# Altium PCB CSI2-KRIA-KV260_Rev01.PcbDoc (part 1 of 3)
Units mm, origin at the board's own origin, x right, y up, seen from the top; angles counter-clockwise.
Board outline 119 x 44.5 mm, 4 copper layers (Layer1 Top, Layer2, Layer3, Layer4 Bottom), stack 1.59 mm thick; 145 components, 82 nets, 488 pads, 229 vias.
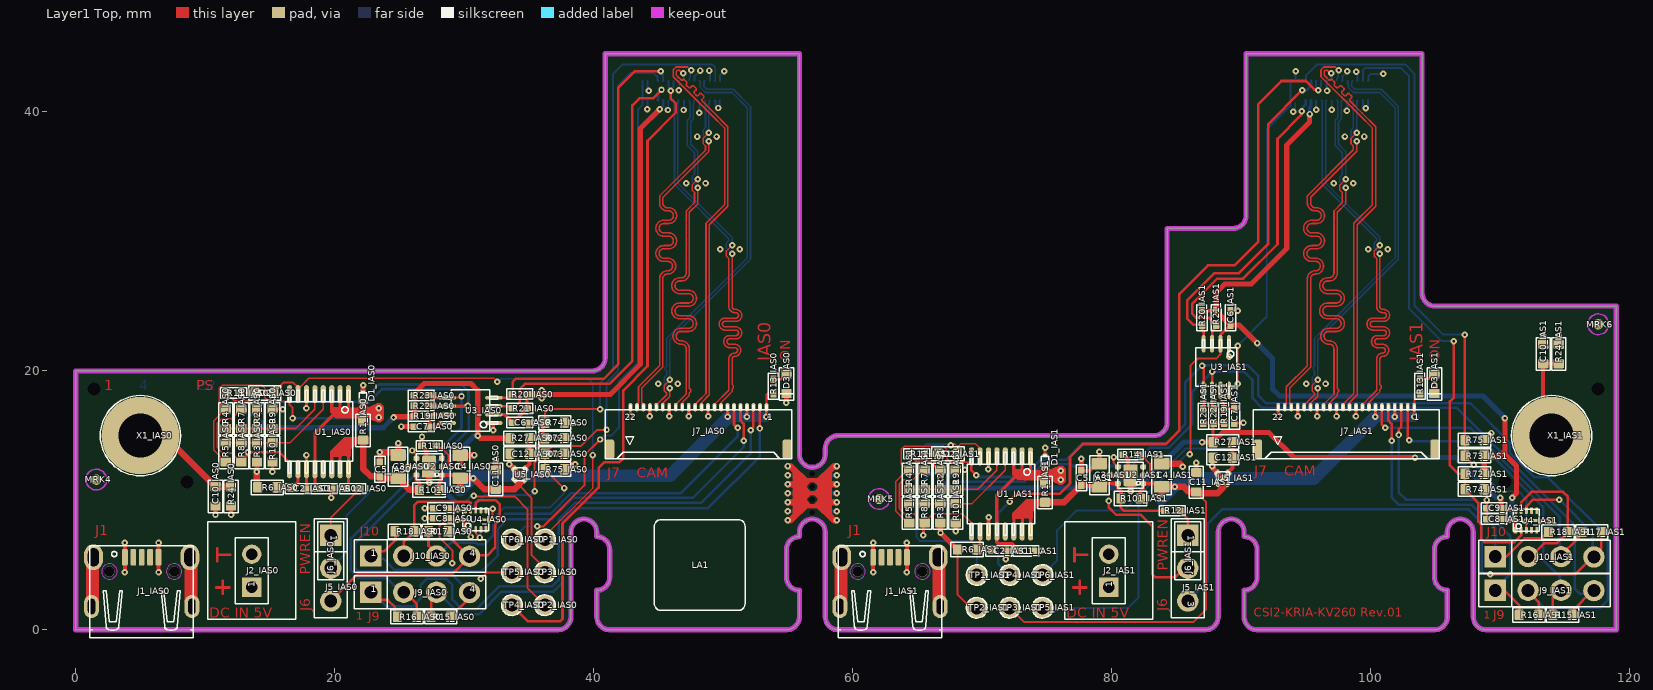
[diagram p0: Layer1 Top view]
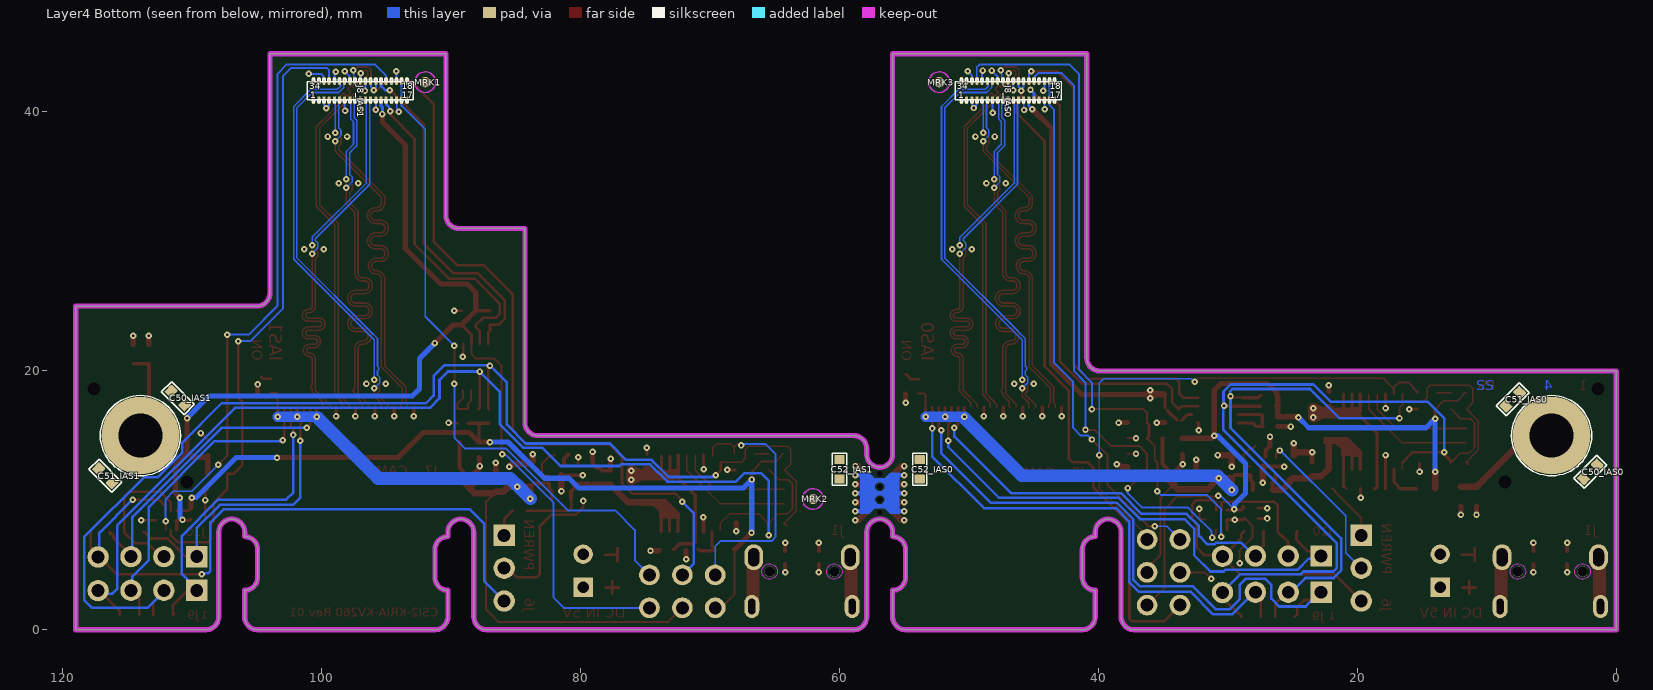
[diagram p1: Layer4 Bottom view, seen from below]
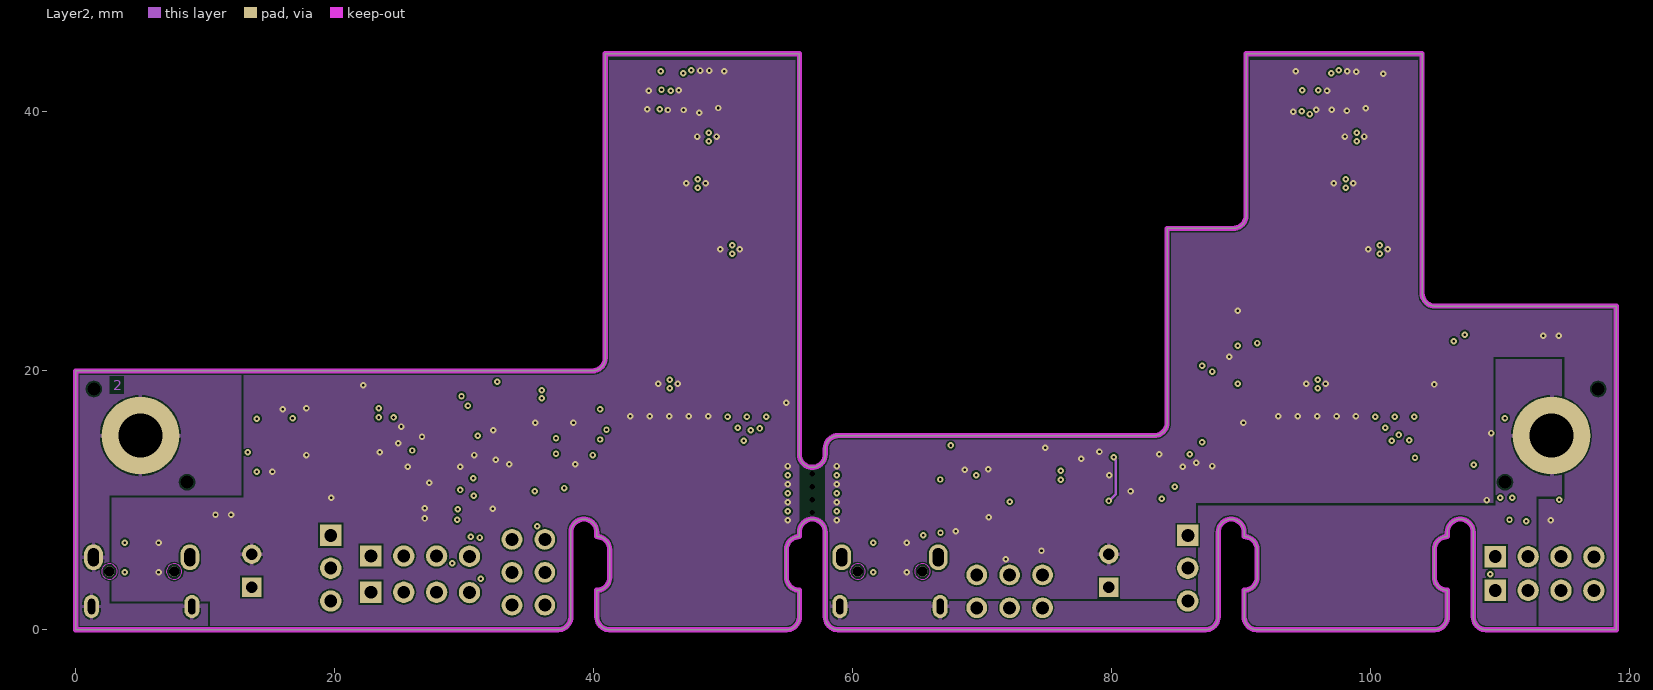
[diagram p2: Layer2]
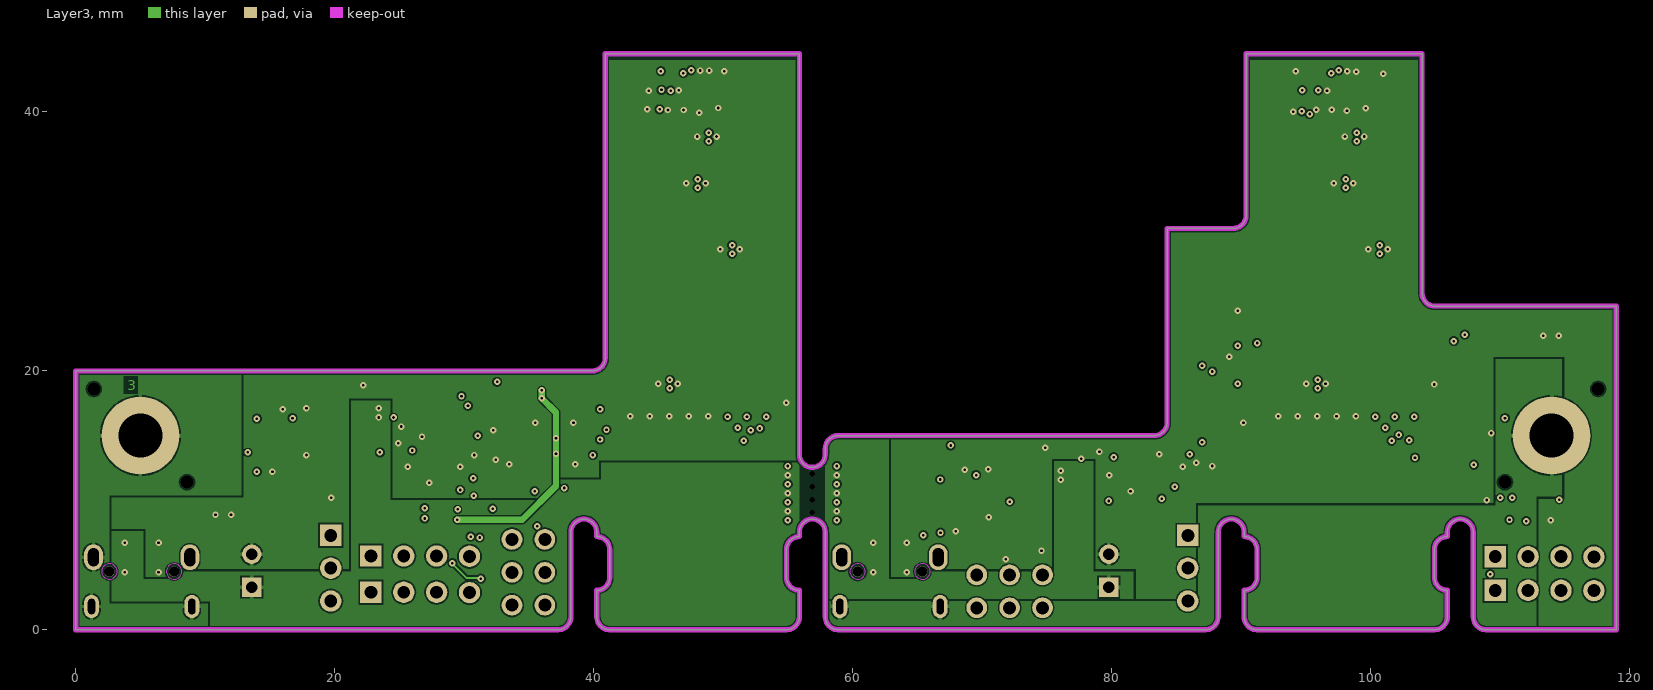
[diagram p3: Layer3]
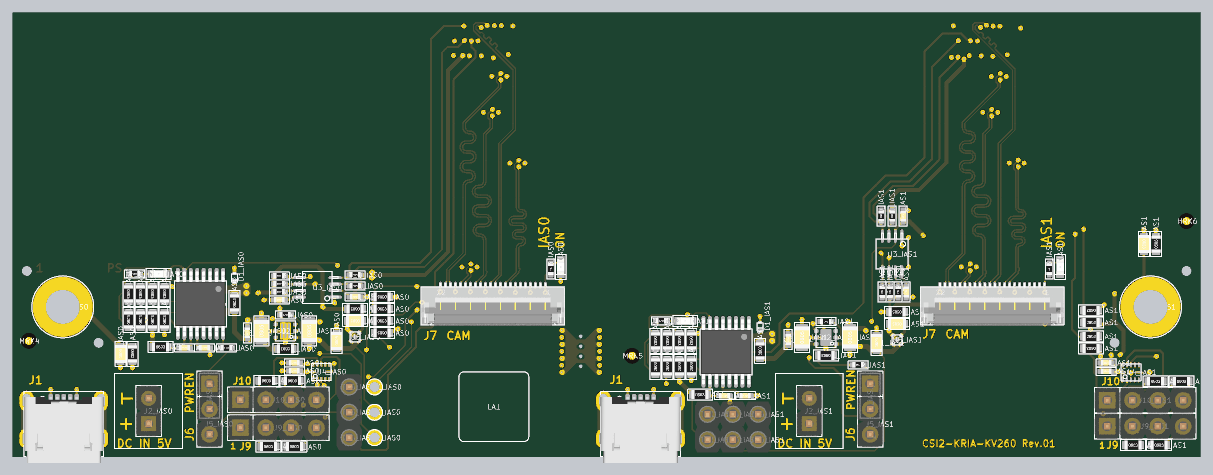
[diagram p6: 3D render of the assembled board from above, using the file's embedded part models]
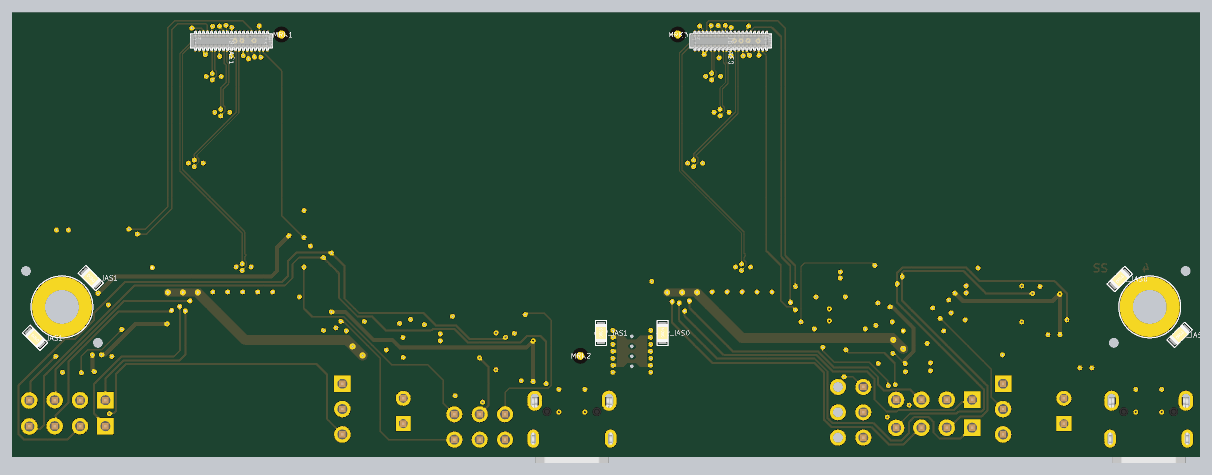
[diagram p7: 3D render of the assembled board from below, using the file's embedded part models]

## Layer stack, top to bottom
Top Solder: solder mask 0.025, Solder Resist, Dk 4
Layer1 Top: signal copper 0.035
Dielectric1: prepreg 0.16, PP-006, Dk 4.7
Layer2: signal copper 0.035
Dielectric2: core 1.13, Core-039, Dk 4.74
Layer3: signal copper 0.035
Dielectric3: prepreg 0.16, PP-006, Dk 4.7
Layer4 Bottom: signal copper 0.035
Bottom Solder: solder mask 0.025, Solder Resist, Dk 4

## Board outline
0,0 1,0 37.26,0 37.251,0 ccw(c37.251,0.999) 38.25,0.999 38.25,7.55 38.252,7.55 cw(c39.252,7.55) 40.252,7.55 40.252,7.2 40.251,7.2 cw(c40.251,6.2) 41.251,6.2 41.251,4.05 cw(c40.251,4.05) 40.251,3.05 40.25,3.05 40.25,0.99 40.251,1.001 ccw(c41.25,1) 41.249,0.001 54.9,0 54.901,0 ccw(c54.901,0.999) 55.9,1 55.899,1 55.899,3.05 55.9,3.05 cw(c55.9,4.05) 54.9,4.05 54.9,6.21 54.9,6.2 cw(c55.9,6.2) 55.9,7.2 55.899,7.2 55.899,7.55 cw(c56.899,7.55) 57.899,7.55 57.901,7.55 57.901,0.999 ccw(c58.9,0.999) 58.9,0 87.26,0 87.251,0 ccw(c87.251,0.999) 88.25,0.999 88.25,7.55 88.252,7.55 cw(c89.252,7.55) 90.252,7.55 90.252,7.2 90.251,7.2 cw(c90.251,6.2) 91.251,6.2 91.251,4.05 cw(c90.251,4.05) 90.251,3.05 90.252,3.05 90.252,1 90.251,1 ccw(c91.25,1) 91.25,0 104.95,0 ccw(c104.95,1) 105.949,1 105.948,1 105.948,3.05 105.949,3.05 cw(c105.949,4.05) 104.949,4.05 104.949,6.21 104.949,6.2 cw(c105.949,6.2) 105.949,7.2 105.948,7.2 105.948,7.55 cw(c106.948,7.55) 107.948,7.55 107.95,7.55 107.95,0.999 ccw(c108.949,0.999) 108.949,0 108.94,0 119,0 119,25 105,25 cw(c105,26) 104,26 104,44.5 90.4,44.5 90.4,32 cw(c89.401,32) 89.401,31.001 84.3,31.001 84.3,16 cw(c83.3,16) 83.3,15 83,15 58.9,15 ccw(c58.9,14) 57.9,14 57.9,13.55 cw(c56.9,13.55) 55.9,13.55 55.899,13.55 55.899,14.991 55.9,15 55.9,44.5 40.9,44.5 40.9,21 cw(c39.9,21) 39.9,20 0,20

## Design rules (kind name [scope] priority, off if disabled: settings)
BoardOutlineClearance [All] p1: gap=0.254 ignorepadtopadclearanceinfootprint=FALSE except(0: Arc-SplitContinuation Track-SplitContinuation SMDPad-SplitContinuation THPad-SplitContinuation Via-SplitContinuation Fill-SplitContinuation Poly-SplitContinuation Region-SplitContinuation Text-SplitContinuation)
Clearance [All] p1: gap=0.125 ignorepadtopadclearanceinfootprint=TRUE except(0: Arc-Hole Track-Hole SMDPad-Hole THPad-Hole Via-Hole Fill-Hole Poly-Hole Region-Hole Text-Hole; 0.3: SMDPad-SMDPad)
ComponentClearance [All] p1 off: gap=0.254 collisioncheckmode=3 verticalgap=0.254 showdistances=FALSE
DiffPairsRouting [All] p1: maxlimit=1 minlimit=0.125 mostfreqgap=0.125 toplayer_minwidth=0.125 toplayer_maxwidth=0.125 toplayer_prefwidth=0.125 midlayer1_minwidth=0.125 midlayer1_maxwidth=0.125 midlayer1_prefwidth=0.125 midlayer2_minwidth=0.125 midlayer2_maxwidth=0.125 midlayer2_prefwidth=0.125 bottomlayer_minwidth=0.125 bottomlayer_maxwidth=0.125 bottomlayer_prefwidth=0.125 maxuncoupledlength=12.7
FabricationTestPointUsage TestPointUsage [All] p1: valid=0 allowmultiple=FALSE
FabricationTestpoint Testpoint [All] p1: side=3 testpointundercomponent=TRUE minsize=1.016 maxsize=2.54 preferedsize=1.524 minholesize=0 maxholesize=1.016 preferedholesize=0.813 testpointgrid=0.025 allowsidetop=TRUE allowsidebottom=TRUE usegrid=TRUE gridtolerance=0
Height [All] p1 off: minheight=0 maxheight=25.4 prefheight=12.7
HoleSize [All] p1: absolutevalues=TRUE maxlimit=50 minlimit=0.025 maxpercent=80.000 minpercent=20.000
MatchedLengths "Schematic Matched Net Lengths" [InNetClass('100 Ohm')] p1: tolerance=0.05 checknetsindiffpair=FALSE checkdiffpairvsdiffpair=TRUE checkxsignals=TRUE checkothers=TRUE
PlaneClearance [All] p1: clearance=0.3
PlaneConnect FreePads [(InPadClass('Free-Pads'))   or (isvia)] p1: planeconnectstyle=Direct reliefexpansion=0.508 reliefentries=4 reliefconductorwidth=0.254 reliefairgap=0.254
PlaneConnect [All] p2: planeconnectstyle=Relief reliefexpansion=0.2 reliefentries=4 reliefconductorwidth=0.2 reliefairgap=0.2
PolygonConnect VIA [isvia or InComponent('X2')] p1: connectstyle=Direct reliefconductorwidth=0.2 reliefentries=4 polygonreliefangle="90 Angle" airgapwidth=0.254
PolygonConnect PolygonConnect_1 [All] p2: connectstyle=Relief reliefconductorwidth=0.3 reliefentries=4 polygonreliefangle="90 Angle" airgapwidth=0.125
RoutingVias [All] p1: holewidth=0.2 width=0.5 viastyle="Through Hole" minholewidth=0.2 minwidth=0.5 maxholewidth=0.2 maxwidth=0.5
SilkToSolderMaskClearance SilkscreenOverComponentPads [IsPad] p1: minsilkscreentomaskgap=0.254 clearancetoexposedcopper=TRUE
SolderMaskExpansion SolderMaskExpansion_VIA [(IsVia)] p1: expansion=-9 istentingtop=FALSE
SolderMaskExpansion [All] p2: expansion=0.05 istentingtop=FALSE
Width [All] p1: maxlimit=5 minlimit=0.1 preferedwidth=0.15
21 further rules are at their usual default settings.

## Classes and differential pairs
channel class CSI2-KRIA-KV260_Rev01-2: IAS0 IAS1
component class IAS0: C1_IAS0 C2_IAS0 C3_IAS0 C4_IAS0 C5_IAS0 C6_IAS0 C7_IAS0 C8_IAS0 C9_IAS0 C10_IAS0 C11_IAS0 C12_IAS0 C50_IAS0 C51_IAS0 C52_IAS0 D1_IAS0 D2_IAS0 D3_IAS0 J1_IAS0 J2_IAS0 J5_IAS0 J6_IAS0 J7_IAS0 J8_IAS0 J9_IAS0 J10_IAS0 R1_IAS0 R2_IAS0 R3_IAS0 R4_IAS0 R5_IAS0 R6_IAS0 R7_IAS0 R8_IAS0 R9_IAS0 R10_IAS0 R11_IAS0 R12_IAS0 R13_IAS0 R14_IAS0 R15_IAS0 R16_IAS0 R17_IAS0 R18_IAS0 R19_IAS0 R20_IAS0 R21_IAS0 R22_IAS0 R23_IAS0 R24_IAS0 R27_IAS0 R72_IAS0 R73_IAS0 R74_IAS0 R75_IAS0 R101_IAS0 TP1_IAS0 TP2_IAS0 TP3_IAS0 TP4_IAS0 TP5_IAS0 TP6_IAS0 U1_IAS0 U2_IAS0 U3_IAS0 U4_IAS0 U5_IAS0 X1_IAS0
component class IAS1: C1_IAS1 C2_IAS1 C3_IAS1 C4_IAS1 C5_IAS1 C6_IAS1 C7_IAS1 C8_IAS1 C9_IAS1 C10_IAS1 C11_IAS1 C12_IAS1 C50_IAS1 C51_IAS1 C52_IAS1 D1_IAS1 D2_IAS1 D3_IAS1 J1_IAS1 J2_IAS1 J5_IAS1 J6_IAS1 J7_IAS1 J8_IAS1 J9_IAS1 J10_IAS1 R1_IAS1 R2_IAS1 R3_IAS1 R4_IAS1 R5_IAS1 R6_IAS1 R7_IAS1 R8_IAS1 R9_IAS1 R10_IAS1 R11_IAS1 R12_IAS1 R13_IAS1 R14_IAS1 R15_IAS1 R16_IAS1 R17_IAS1 R18_IAS1 R19_IAS1 R20_IAS1 R21_IAS1 R22_IAS1 R23_IAS1 R24_IAS1 R27_IAS1 R72_IAS1 R73_IAS1 R74_IAS1 R75_IAS1 R101_IAS1 TP1_IAS1 TP2_IAS1 TP3_IAS1 TP4_IAS1 TP5_IAS1 TP6_IAS1 U1_IAS1 U2_IAS1 U3_IAS1 U4_IAS1 U5_IAS1 X1_IAS1
component class CSI2-KRIA-KV260_Rev01-1: D7 J21 LA1 MRK1 MRK2 MRK3 MRK4 MRK5 MRK6 R33 R40 T1 T2
net class "100 Ohm": B7-CSI2-TXC_IAS0_N B7-CSI2-TXC_IAS0_P B7-CSI2-TXC_IAS1_N B7-CSI2-TXC_IAS1_P B7-CSI2-TXD0_IAS0_N B7-CSI2-TXD0_IAS0_P B7-CSI2-TXD0_IAS1_N B7-CSI2-TXD0_IAS1_P B7-CSI2-TXD1_IAS0_N B7-CSI2-TXD1_IAS0_P B7-CSI2-TXD1_IAS1_N B7-CSI2-TXD1_IAS1_P B7-CSI2-TXD2_IAS0_N B7-CSI2-TXD2_IAS0_P B7-CSI2-TXD2_IAS1_N B7-CSI2-TXD2_IAS1_P B7-CSI2-TXD3_IAS0_N B7-CSI2-TXD3_IAS0_P B7-CSI2-TXD3_IAS1_N B7-CSI2-TXD3_IAS1_P
differential pair B7-CSI2-TXD3_IAS0: +B7-CSI2-TXD3_IAS0_P -B7-CSI2-TXD3_IAS0_N
differential pair B7-CSI2-TXD2_IAS0: +B7-CSI2-TXD2_IAS0_P -B7-CSI2-TXD2_IAS0_N
differential pair B7-CSI2-TXD1_IAS0: +B7-CSI2-TXD1_IAS0_P -B7-CSI2-TXD1_IAS0_N
differential pair B7-CSI2-TXD0_IAS0: +B7-CSI2-TXD0_IAS0_P -B7-CSI2-TXD0_IAS0_N
differential pair B7-CSI2-TXC_IAS0: +B7-CSI2-TXC_IAS0_P -B7-CSI2-TXC_IAS0_N
differential pair B7-CSI2-TXD3_IAS1: +B7-CSI2-TXD3_IAS1_P -B7-CSI2-TXD3_IAS1_N
differential pair B7-CSI2-TXD2_IAS1: +B7-CSI2-TXD2_IAS1_P -B7-CSI2-TXD2_IAS1_N
differential pair B7-CSI2-TXD1_IAS1: +B7-CSI2-TXD1_IAS1_P -B7-CSI2-TXD1_IAS1_N
differential pair B7-CSI2-TXD0_IAS1: +B7-CSI2-TXD0_IAS1_P -B7-CSI2-TXD0_IAS1_N
differential pair B7-CSI2-TXC_IAS1: +B7-CSI2-TXC_IAS1_P -B7-CSI2-TXC_IAS1_N

## Components (designator, comment, footprint, x,y, rotation, side; value= is the part's Value field where it differs from the comment)
C1_IAS0 "NL" C-0402_0.55 19.2,10.9 r0 top (schematic designator C1)
C1_IAS1 "NL" C-0402_0.55 73.4,6.1 r0 top (schematic designator C1)
C2_IAS0 "NL" C-0402_0.55 17.2,10.9 r0 top (schematic designator C2)
C2_IAS1 "NL" C-0402_0.55 71.3,6.1 r0 top (schematic designator C2)
C3_IAS0 "10u" C-0805_1.4 24.9,12.6 r90 top (schematic designator C3)
C3_IAS1 "10u" C-0805_1.4 79.078,11.937 r90 top (schematic designator C3)
C4_IAS0 "10u" C-0805_1.4 29.7,12.6 r90 top (schematic designator C4)
C4_IAS1 "10u" C-0805_1.4 83.878,11.937 r90 top (schematic designator C4)
C5_IAS0 "100n" C-0402_0.55 23.5,12.4 r90 top (schematic designator C5)
C5_IAS1 "100n" C-0402_0.55 77.678,11.737 r90 top (schematic designator C5)
C6_IAS0 "100n" C-0402_0.55 34.3,16 r0 top (schematic designator C6)
C6_IAS1 "100n" C-0402_0.55 89.2,24.1 r90 top (schematic designator C6)
C7_IAS0 "100p" C-0402_0.55 26.7,15.7 r180 top (schematic designator C7)
C7_IAS1 "100p" C-0402_0.55 89.5,16.5 r270 top (schematic designator C7)
C8_IAS0 "100n" C-0402_0.55 28.2,8.6 r180 top (schematic designator C8)
C8_IAS1 "100n" C-0402_0.55 109.55,8.55 r180 top (schematic designator C8)
C9_IAS0 "100n" C-0402_0.55 28.2,9.4 r180 top (schematic designator C9)
C9_IAS1 "100n" C-0402_0.55 109.55,9.4 r180 top (schematic designator C9)
C10_IAS0 "NL" C-0603_1.0 10.8,10.3 r90 top (schematic designator C10)
C10_IAS1 "NL" C-0603_1.0 113.35,21.3 r270 top (schematic designator C10)
C11_IAS0 "4u7" C-0603_1.0 32.45,11.6 r90 top (schematic designator C11)
C11_IAS1 "4u7" C-0603_1.0 86.55,11.4 r90 top (schematic designator C11)
C12_IAS0 "4u7" C-0603_1.0 34.3,13.6 r180 top (schematic designator C12)
C12_IAS1 "4u7" C-0603_1.0 88.6,13.3 r180 top (schematic designator C12)
C50_IAS0 "4u7" C-0603_1.0 2,12.2 r135 bottom (schematic designator C50)
C50_IAS1 "4u7" C-0603_1.0 111.1,17.9 r45 bottom (schematic designator C50)
C51_IAS0 "4u7" C-0603_1.0 8,17.8 r135 bottom (schematic designator C51)
C51_IAS1 "4u7" C-0603_1.0 116.7,11.9 r45 bottom (schematic designator C51)
C52_IAS0 "4u7" C-0603_1.0 53.8,12.4 r90 bottom (schematic designator C52)
C52_IAS1 "4u7" C-0603_1.0 60,12.4 r90 bottom (schematic designator C52)
D1_IAS0 "ESD9B5.0ST5G" D-SOD923 22.2,17.9 r270 top (schematic designator D1)
D1_IAS1 "ESD9B5.0ST5G" D-SOD923 74.878,13 r270 top (schematic designator D1)
D2_IAS0 "RED" D-0603-LED 14.6,18.3 r180 top (schematic designator D2)
D2_IAS1 "RED" D-0603-LED 67.378,13.6 r180 top (schematic designator D2)
D3_IAS0 "GREEN" D-0603-LED 54.9,19 r90 top (schematic designator D3)
D3_IAS1 "GREEN" D-0603-LED 104.95,19 r90 top (schematic designator D3)
J1_IAS0 "USB 2.0 Typ B 90°" J-629105150521 5.1,5.6 r0 top (schematic designator J1)
J1_IAS1 "USB 2.0 Typ B 90°" J-629105150521 62.9,5.6 r0 top (schematic designator J1)
J2_IAS0 "CON1x2" "CON 1x2 RM2.54" 13.6,3.3 r90 top (schematic designator J2)
J2_IAS1 "CON1x2" "CON 1x2 RM2.54" 79.8,3.3 r90 top (schematic designator J2)
J5_IAS0 "Jumper" J-JUMPER-2.54 19.7,6.1 r90 top (schematic designator J5)
J5_IAS1 "Jumper" J-JUMPER-2.54 85.9,6.1 r90 top (schematic designator J5)
J6_IAS0 "CON1x3" "CON 1x3 RM2.54" 19.7,7.3 r270 top (schematic designator J6)
J6_IAS1 "CON1x3" "CON 1x3 RM2.54" 85.9,7.3 r270 top (schematic designator J6)
J7_IAS0 "CON FFC22_Inverted" "J-FH55-22S-0.5SH - Inverted Pins" 48.1,17.2 r0 top (schematic designator J7)
J7_IAS1 "CON FFC22_Inverted" "J-FH55-22S-0.5SH - Inverted Pins" 98.14,17.2 r0 top (schematic designator J7)
J8_IAS0 "BM20B(0.8)-34DP-0.4V(51)" J-BM20B(0.8)-34DP 46.98,41.65 r180 bottom (schematic designator J8)
J8_IAS1 "BM20B(0.8)-34DP-0.4V(51)" J-BM20B(0.8)-34DP 97.02,41.65 r180 bottom (schematic designator J8)
J9_IAS0 "CON1x4" "CON 1x4 RM2.54" 22.8,2.9 r0 top (schematic designator J9)
J9_IAS1 "CON1x4" "CON 1x4 RM2.54" 109.65,3.05 r0 top (schematic designator J9)
J10_IAS0 "CON1x4" "CON 1x4 RM2.54" 22.8,5.7 r0 top (schematic designator J10)
J10_IAS1 "CON1x4" "CON 1x4 RM2.54" 109.65,5.65 r0 top (schematic designator J10)
LA1 "LABEL 7x7mm" "PCB LABEL 7x7" 48.2,5 r90 top
MRK1 "Marker Single Layer" PCB_Marker_Pad_top 92,42.3 r180 bottom
MRK2 "Marker Single Layer" PCB_Marker_Pad_top 62.05,10.1 r180 bottom
MRK3 "Marker Single Layer" PCB_Marker_Pad_top 52.3,42.3 r180 bottom
MRK4 "Marker Single Layer" PCB_MARKER_PAD_TOP 1.6,11.6 r90 top
MRK5 "Marker Single Layer" PCB_MARKER_PAD_TOP 62.05,10.1 r0 top
MRK6 "Marker Single Layer" PCB_MARKER_PAD_TOP 117.6,23.6 r90 top
R1_IAS0 "0R0" R-0603_0.6 22.2,15.4 r90 top (schematic designator R1)
R1_IAS1 "0R0" R-0603_0.6 74.878,10.6 r90 top (schematic designator R1)
R2_IAS0 "NL" R-0603_0.6 14,16.3 r270 top (schematic designator R2)
R2_IAS1 "NL" R-0603_0.6 66.778,11.6 r270 top (schematic designator R2)
R3_IAS0 "0R0" R-0603_0.6 14,13.7 r90 top (schematic designator R3)
R3_IAS1 "0R0" R-0603_0.6 66.778,9 r90 top (schematic designator R3)
R4_IAS0 "NL" R-0603_0.6 11.6,16.3 r270 top (schematic designator R4)
R4_IAS1 "NL" R-0603_0.6 64.378,11.6 r270 top (schematic designator R4)
R5_IAS0 "NL" R-0603_0.6 11.6,13.7 r90 top (schematic designator R5)
R5_IAS1 "NL" R-0603_0.6 64.378,9 r90 top (schematic designator R5)
R6_IAS0 "NL" R-0603_0.6 14.8,11 r0 top (schematic designator R6)
R6_IAS1 "NL" R-0603_0.6 68.85,6.2 r0 top (schematic designator R6)
R7_IAS0 "NL" R-0603_0.6 12.8,16.3 r270 top (schematic designator R7)
R7_IAS1 "NL" R-0603_0.6 65.578,11.6 r270 top (schematic designator R7)
R8_IAS0 "NL" R-0603_0.6 12.8,13.7 r90 top (schematic designator R8)
R8_IAS1 "NL" R-0603_0.6 65.578,9 r90 top (schematic designator R8)
R9_IAS0 "0R0" R-0603_0.6 15.2,16.3 r270 top (schematic designator R9)
R9_IAS1 "0R0" R-0603_0.6 67.978,11.6 r270 top (schematic designator R9)
R10_IAS0 "NL" R-0603_0.6 15.2,13.7 r90 top (schematic designator R10)
R10_IAS1 "NL" R-0603_0.6 67.978,9 r90 top (schematic designator R10)
R11_IAS0 "NL" R-0402_0.4 12.2,18.3 r0 top (schematic designator R11)
R11_IAS1 "NL" R-0402_0.4 64.978,13.6 r0 top (schematic designator R11)
R12_IAS0 "270k" R-0402_0.4 21.4,10.9 r0 top (schematic designator R12)
R12_IAS1 "270K" R-0402_0.4 84.7,9.2 r0 top (schematic designator R12)
R13_IAS0 "3k3" R-0402_0.4 53.9,18.8 r90 top (schematic designator R13)
R13_IAS1 "3k3" R-0402_0.4 103.85,18.8 r90 top (schematic designator R13)
R14_IAS0 "51k" R-0402_0.4 27.3,14.2 r0 top (schematic designator R14)
R14_IAS1 "51k" R-0402_0.4 81.478,13.537 r0 top (schematic designator R14)
R15_IAS0 "0R0" R-0603_0.6 28.2,1 r0 top (schematic designator R15)
R15_IAS1 "0R0" R-0603_0.6 114.85,1.15 r0 top (schematic designator R15)
R16_IAS0 "0R0" R-0603_0.6 25.6,1 r0 top (schematic designator R16)
R16_IAS1 "0R0" R-0603_0.6 112.25,1.15 r0 top (schematic designator R16)
R17_IAS0 "NL" R-0603_0.6 28,7.6 r0 top (schematic designator R17)
R17_IAS1 "NL" R-0603_0.6 117.1,7.55 r0 top (schematic designator R17)
R18_IAS0 "NL" R-0603_0.6 25.4,7.6 r0 top (schematic designator R18)
R18_IAS1 "NL" R-0603_0.6 114.5,7.55 r0 top (schematic designator R18)
R19_IAS0 "200k" R-0402_0.4 26.7,16.5 r180 top (schematic designator R19)
R19_IAS1 "200k" R-0402_0.4 88.7,16.5 r270 top (schematic designator R19)
R20_IAS0 "2k0" R-0402_0.4 34.3,18.2 r180 top (schematic designator R20)
R20_IAS1 "2k0" R-0402_0.4 87,24.1 r270 top (schematic designator R20)
R21_IAS0 "2k0" R-0402_0.4 34.3,17.1 r180 top (schematic designator R21)
R21_IAS1 "2k0" R-0402_0.4 88.1,24.1 r270 top (schematic designator R21)
R22_IAS0 "2k0" R-0402_0.4 26.7,17.3 r180 top (schematic designator R22)
R22_IAS1 "2k0" R-0402_0.4 87.9,16.5 r270 top (schematic designator R22)
R23_IAS0 "2k0" R-0402_0.4 26.7,18.1 r180 top (schematic designator R23)
R23_IAS1 "2k0" R-0402_0.4 87.1,16.5 r270 top (schematic designator R23)
R24_IAS0 "0R0" R-0603_0.6 12,10.3 r270 top (schematic designator R24)
R24_IAS1 "0R0" R-0603_0.6 114.55,21.3 r90 top (schematic designator R24)
R27_IAS0 "0R0" R-0603_0.6 34.3,14.8 r180 top (schematic designator R27)
R27_IAS1 "0R0" R-0603_0.6 88.6,14.5 r180 top (schematic designator R27)
R72_IAS0 "NL" R-0603_0.6 37,14.8 r0 top (schematic designator R72)
R72_IAS1 "NL" R-0603_0.6 108.05,12.05 r0 top (schematic designator R72)
R73_IAS0 "NL" R-0603_0.6 37,13.6 r0 top (schematic designator R73)
R73_IAS1 "NL" R-0603_0.6 108.05,13.45 r0 top (schematic designator R73)
R74_IAS0 "NL" R-0603_0.6 37,16 r180 top (schematic designator R74)
R74_IAS1 "NL" R-0603_0.6 108.05,10.85 r180 top (schematic designator R74)
R75_IAS0 "NL" R-0603_0.6 37,12.4 r180 top (schematic designator R75)
R75_IAS1 "NL" R-0603_0.6 108.05,14.65 r180 top (schematic designator R75)
R101_IAS0 "NL" R-0603_0.6 27.3,10.8 r180 top (schematic designator R101)
R101_IAS1 "NL" R-0603_0.6 81.478,10.137 r180 top (schematic designator R101)
T1 "PCB Text TOP" "PCB TEXTFIELD TOP 2" 39.35,-3.6 r0 top locked
T2 "PCB Text BOT" "PCB TEXTFIELD BOT 2" 39.35,-3.6 r180 bottom locked
TP1_IAS0 "TP" TP_16_10 36.24,6.98 r0 top (schematic designator TP1)
TP1_IAS1 "TP" TP_16_10 69.6,4.24 r0 top (schematic designator TP1)
TP2_IAS0 "TP" TP_16_10 36.24,1.9 r180 top (schematic designator TP2)
TP2_IAS1 "TP" TP_16_10 69.6,1.7 r0 top (schematic designator TP2)
TP3_IAS0 "TP" TP_16_10 36.24,4.44 r270 top (schematic designator TP3)
TP3_IAS1 "TP" TP_16_10 72.14,1.7 r0 top (schematic designator TP3)
TP4_IAS0 "TP" TP_16_10 33.7,1.9 r0 top (schematic designator TP4)
TP4_IAS1 "TP" TP_16_10 72.14,4.24 r0 top (schematic designator TP4)
TP5_IAS0 "TP" TP_16_10 33.7,4.44 r0 top (schematic designator TP5)
TP5_IAS1 "TP" TP_16_10 74.68,1.7 r0 top (schematic designator TP5)
TP6_IAS0 "TP" TP_16_10 33.7,6.98 r0 top (schematic designator TP6)
TP6_IAS1 "TP" TP_16_10 74.68,4.24 r0 top (schematic designator TP6)
U1_IAS0 "INA260AIPWR" "IC-TSSOP16 6.4x5.1x1.2" 18.8,15.3 r270 top (schematic designator U1)
U1_IAS1 "INA260AIPWR" "IC-TSSOP16 6.4x5.1x1.2" 71.478,10.5 r270 top (schematic designator U1)
U2_IAS0 "TPS25200DRVT" IC-DFN06_2.0x2.0x0.8#1 27.3,12.6 r90 top (schematic designator U2)
U2_IAS1 "TPS25200DRVT" IC-DFN06_2.0x2.0x0.8#2 81.478,11.937 r90 top (schematic designator U2)
U3_IAS0 "PCA9306DCTR" IC-TSSOP8_3.15x4.25x1.3 30.5,16.95 r180 top (schematic designator U3)
U3_IAS1 "PCA9306DCTR" IC-TSSOP8_3.15x4.25x1.3 88.1,20.3 r270 top (schematic designator U3)
U4_IAS0 "NTB0104GU12,115" IC-XQFN12_1.7x2x0.5 30.9,8.5 r90 top (schematic designator U4)
U4_IAS1 "NTB0104GU12,115" IC-XQFN12_1.7x2x0.5 112.05,8.45 r90 top (schematic designator U4)
U5_IAS0 "NCP114AMX330TCG" IC-XDFN4_1.0x1.0x0.6 34.3,12 r180 top (schematic designator U5)
U5_IAS1 "NCP114AMX330TCG" IC-XDFN4_1.0x1.0x0.6 88.6,11.7 r180 top (schematic designator U5)
X1_IAS0 "Hole" HOLE-3.4-6.0-DK 5,15 r0 top (schematic designator X1)
X1_IAS1 "Hole" HOLE-3.4-6.0-DK 114,15 r0 top (schematic designator X1)

## Footprints (in the part's own frame and the unit in brackets; to place one, negate y for a bottom-side part, rotate by r counter-clockwise, add the part's x,y. Pads: shape width x height; smd on the part's side, far side on the other; paste and mask are expansions set on the pad)
C-0402_0.55 [mm]
  rrect20% 0.6x0.5 smd: 1(-0.55,0) 2(0.55,0)
  silkscreen extent -1,-0.4 1,0.4, body extent -0.53,-0.27 0.54,0.28, height 0.55
C-0603_1.0 [mm]
  rrect20% 0.7x0.8 smd: 1(-0.75,0) 2(0.75,0)
  silkscreen extent -1.25,-0.55 1.25,0.55, body extent -0.9,-0.5 0.9,0.5, height 0.99
C-0805_1.4 [mm]
  rrect20% 0.9x1.2 smd: 1(-0.9,0) 2(0.9,0)
  silkscreen extent -1.5,-0.75 1.5,0.75, body extent -1.1,-0.7 1.1,0.7, height 1.4
"CON 1x2 RM2.54" [mm]
  rect 1.5x1.5 hole 0.9: 1(0,0)
  round 1.5 hole 0.9: 2(2.54,0)
  silkscreen extent -1.27,-1.27 3.81,1.27, body extent -1.26,-1.27 3.82,1.27, height 8.57
"CON 1x3 RM2.54" [mm]
  rect 1.65x1.65 hole 1: 1(0,0)
  round 1.65 hole 1: 2(2.54,0) 3(5.08,0)
  silkscreen extent -1.27,-1.27 6.35,1.27, body extent -1.28,-1.27 6.34,1.27, height 8.57
"CON 1x4 RM2.54" [mm] "RM2.54 Connector 1x4"
  rect 1.65x1.65 hole 1: 1(0,0)
  round 1.65 hole 1: 2(2.54,0) 3(5.08,0) 4(7.62,-0.025)
  silkscreen extent -1.27,-1.27 8.89,1.27, body extent -1.28,-1.26 8.88,1.28, height 8.57
D-0603-LED [mm] "Osram Chip LED 0603"
  rrect20% 0.7x0.8 smd: A(0.75,0) K(-0.75,0)
  silkscreen extent -1.25,-0.55 1.25,0.55, body extent -0.82,-0.36 0.83,0.36, height 0.67
D-SOD923 [mm]
  rrect20% 0.3x0.4 smd: A(-0.45,0) K(0.45,0)
  silkscreen extent -0.5,-0.3 0.5,0.3, body extent -0.4,-0.3 0.4,0.3, height 0.4
HOLE-3.4-6.0-DK [mm]
  round 6 hole 3.4: 1(0,0)
  silkscreen extent -3.1,-3.1 3.1,3.1
IC-DFN06_2.0x2.0x0.8#1 [mm]
  rrect50% 0.4x0.45 smd paste-0.02: 1(-0.65,-0.975) 2(0,-0.975) 3(0.65,-0.975) 4(0.65,0.975) 5(0,0.975) 6(-0.65,0.975)
  rrect20% 1.7x1.1 smd paste-9: 7(0,0)
  silkscreen extent -1,-1 1,1, body extent -1,-1 1,1, height 0.85
IC-DFN06_2.0x2.0x0.8#2 [mm]
  rrect50% 0.4x0.45 smd: 1(-0.65,-0.975) 2(0,-0.975) 3(0.65,-0.975) 4(0.65,0.975) 5(0,0.975) 6(-0.65,0.975)
  rrect20% 1.7x1.1 smd: 7(0,0)
  silkscreen extent -1,-1 1,1, body extent -1,-1 1,1, height 0.85
IC-TSSOP8_3.15x4.25x1.3 [mm]
  oval 1.35x0.3 smd: 1(-1.8,0.975) 2(-1.8,0.325) 3(-1.8,-0.325) 4(-1.8,-0.975) 5(1.8,-0.975) 6(1.8,-0.325) 7(1.8,0.325) 8(1.8,0.975)
  silkscreen extent -2.1,-1.6 2.1,1.6, body extent -1.5,-1.6 1.5,1.6, height 1.35
"IC-TSSOP16 6.4x5.1x1.2" [mm]
  oval 1.4x0.4 smd: 1(-2.9,2.275) 2(-2.9,1.625) 3(-2.9,0.975) 4(-2.9,0.325) 5(-2.9,-0.325) 6(-2.9,-0.975) 7(-2.9,-1.625) 8(-2.9,-2.275) 9(2.9,-2.275) 10(2.9,-1.625) 11(2.9,-0.975) 12(2.9,-0.325) 13(2.9,0.325) 14(2.9,0.975) 15(2.9,1.625) 16(2.9,2.275)
  silkscreen extent -3.2,-2.6 3.2,2.6, body extent -3.2,-2.5 3.2,2.5, height 1.1
IC-XDFN4_1.0x1.0x0.6 [mm]
  rrect50% 0.35x0.5 smd rot 45 paste-0.02 mask+0.05: 1(-0.425,-0.425) 3(0.425,0.425)
  rrect50% 0.35x0.5 smd rot 135 paste-0.02 mask+0.05: 2(0.425,-0.425) 4(-0.425,0.425)
  rrect30% 0.5x0.5 smd rot 45 paste-0.025 mask+0.05: 5(0,0)
  silkscreen extent -0.5,-0.5 0.5,0.5, body extent -0.5,-0.5 0.5,0.5, height 0.6
IC-XQFN12_1.7x2x0.5 [mm]
  rrect50% 0.5x0.32 smd paste-0.025 mask+0.05: 1(-0.75,0.85)
  rrect50% 0.5x0.22 smd paste-0.025 mask+0.05: 2(-0.75,0.4) 3(-0.75,0) 4(-0.75,-0.4) 5(-0.75,-0.8) 7(0.75,-0.8) 8(0.75,-0.4) 9(0.75,0) 10(0.75,0.4) 11(0.75,0.8)
  rrect50% 0.22x0.65 smd paste-0.02 mask+0.05: 6(0,-0.825)
  rrect50% 0.22x0.65 smd paste-0.025 mask+0.05: 12(0,0.825)
  silkscreen extent -0.85,-1 0.85,1, body extent -0.85,-1 0.85,1, height 0.6
J-629105150521 [mm]
  rrect50% 0.45x1.3 smd: 1(-1.3,0) 2(-0.65,0) 3(0,0) 4(0.65,0) 5(1.3,0)
  oval 1.15x1.8 hole 0.55 slot 1.2 at 90 deg: 6(-3.875,-3.8) 9(3.875,-3.8)
  oval 1.45x2 hole 0.85 slot 1.4 at 90 deg: 7(-3.725,0) 8(3.725,0)
  round 0.8 hole 0.8 unplated: ""(-2.5,-1.1) ""(2.5,-1.1)
  Keep-Out Layer circle w0.025: c-2.5,-1.1 r0.6
  Keep-Out Layer circle w0.025: c2.5,-1.1 r0.6
  silkscreen extent -4,-6.2 4,0.9, body extent -4,-6.25 4,0.35, height 2.67
J-BM20B(0.8)-34DP [mm]
  rrect50% 0.23x0.6 smd paste-0.025 mask+0.05: 1(-3.2,-0.75) 2(-2.8,-0.75) 3(-2.4,-0.75) 4(-2,-0.75) 5(-1.6,-0.75) 6(-1.2,-0.75) 7(-0.8,-0.75) 8(-0.4,-0.75) 9(0,-0.75) 10(0.4,-0.75) 11(0.8,-0.75) 12(1.2,-0.75) 13(1.6,-0.75) 14(2,-0.75) 15(2.4,-0.75) 16(2.8,-0.75) 17(3.2,-0.75) 18(3.2,0.75) 19(2.8,0.75) 20(2.4,0.75) 21(2,0.75) 22(1.6,0.75) 23(1.2,0.75) 24(0.8,0.75) 25(0.4,0.75) 26(0,0.75) 27(-0.4,0.75) 28(-0.8,0.75) 29(-1.2,0.75) 30(-1.6,0.75) 31(-2,0.75) 32(-2.4,0.75) 33(-2.8,0.75) 34(-3.2,0.75) 35(-3.6,0.75) 36(-3.6,-0.75) 37(3.6,0.75) 38(3.6,-0.75)
  silkscreen extent -4.1,-0.9 4.1,0.9, body extent -4.1,-0.88 4.1,0.9, height 0.67
"J-FH55-22S-0.5SH - Inverted Pins" [mm]
  oval 0.3x0.65 smd: 1(5.25,0) 2(4.75,0) 3(4.25,0) 4(3.75,0) 5(3.25,0) 6(2.75,0) 7(2.25,0) 8(1.75,0) 9(1.25,0) 10(0.75,0) 11(0.25,0) 12(-0.25,0) 13(-0.75,0) 14(-1.25,0) 15(-1.75,0) 16(-2.25,0) 17(-2.75,0) 18(-3.25,0) 19(-3.75,0) 20(-4.25,0) 21(-4.75,0) 22(-5.25,0)
  rrect50% 0.7x1.5 smd: 23(-6.85,-3.25) 24(6.85,-3.25)
  silkscreen extent -7.2,-4 7.2,0.15, body extent -7.2,-4.05 7.2,0.2, height 1.46
J-JUMPER-2.54 [mm]
  silkscreen extent -2.25,-1 2.25,1, body extent -2.5,-1.25 2.5,1.25, height 9.5
"PCB LABEL 7x7" [mm]
  silkscreen extent -3.5,-3.5 3.5,3.5, body extent -3.5,-3.5 3.5,3.5, height 0.1
"PCB TEXTFIELD BOT 2" [mm]
"PCB TEXTFIELD TOP 2" [mm]
PCB_Marker_Pad_top [mm] "PCB Marker with Pad for X-/Y-Coordinates (Single Layer)"
  round 0.8 smd paste-999 mask+0.4: 1(0,0)
  Layer1 Top keep-out circle w0.1: c0,0 r0.8
PCB_MARKER_PAD_TOP [mm] "PCB Marker with Pad for X-/Y-Coordinates (Single Layer)"
  round 0.8 smd paste-999 mask+0.4: 1(0,0)
  Layer1 Top keep-out circle w0.1: c0,0 r0.8
R-0402_0.4 [mm]
  rrect20% 0.6x0.5 smd: 1(-0.55,0) 2(0.55,0)
  silkscreen extent -1,-0.4 1,0.4, body extent -0.53,-0.27 0.54,0.28, height 0.39
R-0603_0.6 [mm]
  rrect20% 0.7x0.8 smd: 1(-0.75,0) 2(0.75,0)
  silkscreen extent -1.25,-0.55 1.25,0.55, body extent -0.85,-0.45 0.85,0.45, height 0.59
TP_16_10 [mm] "Testpoint: Pad=1,6mm; Hole=1,0mm"
  round 1.6 hole 1: 1(0,0)
  silkscreen extent -0.8,-0.8 0.8,0.8

## Part data
C1_IAS0 C1_IAS1 C2_IAS0 C2_IAS1: library part "C X 0402", "Capacitor Ceramic SMD/0402/50V/X7R/10%", Dielectric=X7R, Manufacturer=several, Tolerance=10%, Voltage=50V, Manufacturer Part Number=several
C3_IAS0 C3_IAS1 C4_IAS0 C4_IAS1: library part "C 10U 16V X5R 0805", "Capacitor Ceramic SMD/0805/16V/X5R/10%", Dielectric=X5R, KHK Part Number=K8340151, Manufacturer=several, Supplier Part Number 1=478-5165-1-ND, Tolerance=10%, Voltage=16V, Manufacturer Part Number=several, Supplier 1=Digi-Key
C5_IAS0 C5_IAS1 C6_IAS0 C6_IAS1 C8_IAS0 C8_IAS1 C9_IAS0 C9_IAS1: library part "C 100N 10% 16V X7R 402", "Capacitor Ceramic SMD/0402/16V/X7R/10%", Dielectric=X7R, KHK Part Number=K8340114, Manufacturer=several, Supplier Part Number 1=1276-1508-1-ND, Tolerance=10%, Voltage=16V, Manufacturer Part Number=several, Supplier 1=Digi-Key, Supplier 2=Digi-Key, Supplier Part Number 2=311-1338-1-ND
C7_IAS0 C7_IAS1: library part "C 100P 50V X7R 0402", "Capacitor Ceramic SMD/0402/50V/X7R/10%", Dielectric=X7R, KHK Part Number=K8340145, Manufacturer=several, Supplier Part Number 1=478-1089-1-ND, Tolerance=10%, Voltage=50V, Manufacturer Part Number=several, Supplier 1=Digi-Key
C10_IAS0 C10_IAS1: library part "C X 0603", "Capacitor Ceramic SMD/0603/50V/X7R/10%", Dielectric=X7R, Manufacturer=several, Tolerance=10%, Voltage=50V, Manufacturer Part Number=several
C11_IAS0 C11_IAS1 C12_IAS0 C12_IAS1 C50_IAS0 C50_IAS1 C51_IAS0 C51_IAS1 C52_IAS0 C52_IAS1: library part "C 4U7 10V X5R 0603", "Capacitor Ceramic SMD/0603/10V/X5R/10%", Dielectric=X5R, KHK Part Number=1431, Manufacturer=several, Supplier Part Number 1=399-9100-1-ND, Tolerance=10%, Voltage=10V, Manufacturer Part Number=several, Supplier 1=Digi-Key
D1_IAS0 D1_IAS1: library part "D ESD9B5.0ST5G", "DIODE TVS; 400W; 5.8-7.8V; BIDIRECT", KHK Part Number=7250, Manufacturer="ON Semiconductor", Supplier Part Number 1=ESD9B5.0ST5GOSCT-ND, Manufacturer Part Number=ESD9B5.0ST5G, Supplier 1=Digi-Key
D2_IAS0 D2_IAS1: library part "D LED 0603 red", "Chip LED red 250mcd", Color=red, Current=20mA, KHK Part Number=8145, Manufacturer=Würth, Manufacturer Part Number=150060RS75000, Supplier Part Number 1=732-4978-1-ND, Supplier 1=Digi-Key
D3_IAS0 D3_IAS1: library part "D LED 0603 green", "Chip LED green 430mcd", Color=green, Current=20mA, KHK Part Number=8172, Manufacturer=Würth, Manufacturer Part Number=150060GS75000, Supplier Part Number 1=732-4971-1-ND, Supplier 1=Digi-Key
J1_IAS0 J1_IAS1: library part "CON USB 2.0 Typ B 90°", "Micro USB 2.0 Typ B 90°", KHK Part Number=14360, Manufacturer=WE, Manufacturer Part Number="629 105 150 521", Supplier Part Number 1=732-5960-1-ND, Supplier 1=Digi-Key
J2_IAS0 J2_IAS1: library part "CON 1x2 2.54 several", "Header Vertical, 1x2 Pos, Pitch 2.54mm, Contact Length Mating 6.00mm, Contact Length Post 3.00mm, Insulation Height 2.54mm, Gold Plating", KHK Part Number=15337, Manufacturer=several, Supplier Part Number 1=732-5315-ND, Manufacturer Part Number=several, Supplier 1=Digi-Key
J5_IAS0 J5_IAS1: library part "CON Jumper 2.54mm", "CON/JUMPER/STC02SYAN; 2-pin; 2.54mm; 3A; FEMALE; VERTICAL; BLACK", KHK Part Number=13444, Manufacturer=several, Supplier Part Number 1=S9000-ND, Manufacturer Part Number=several, Supplier 1=Digi-Key
J6_IAS0 J6_IAS1: library part "CON 1x3 2.54 several", "Header Vertical, 1x3 Pos, Pitch 2.54mm, Contact Length Mating 6.00mm, Contact Length Post 3.00mm, Insulation Height 2.54mm, Gold Plating", KHK Part Number=15338, Manufacturer=several, Supplier Part Number 1=732-5316-ND, Manufacturer Part Number=several, Supplier 1=Digi-Key
J7_IAS0 J7_IAS1: library part "CON FFC22_FH55-22S-0.5SH_Inverted", "FFC Connector 0.5mm shielded", KHK Part Number=10357, Manufacturer=Hirose, Manufacturer Part Number=FH55-22S-0.5SH, Supplier Part Number 1=798-FH55-22S-0.5SH, Supplier 1=Mouser
J8_IAS0 J8_IAS1: library part "CON BM20B(0.8)-34DP", "CON/B2B/BM20B;34-pin;0.4;SMT;HEADER;VERTICAL", KHK Part Number=18690, Manufacturer=HiRose, Manufacturer Part Number=BM20B(0.8)-34DP-0.4V(51)
J9_IAS0 J9_IAS1 J10_IAS0 J10_IAS1: library part "CON 1x4 2.54 several", "Header Vertical, 1x4 Pos, Pitch 2.54mm, Contact Length Mating 6.00mm, Contact Length Post 3.00mm, Insulation Height 2.54mm, Gold Plating", KHK Part Number=15343, Manufacturer=several, Supplier Part Number 1=732-5317-ND, Manufacturer Part Number=several, Supplier 1=Digi-Key
LA1: library part "PCB LABEL 7x7", Manufacturer=several, Manufacturer Part Number=several
MRK1 MRK2 MRK3 MRK4 MRK5 MRK6: library part "PCB Marker Pad Single Layer", "Position Marker for PCBs"
R1_IAS0 R1_IAS1 R3_IAS0 R3_IAS1 R9_IAS0 R9_IAS1 R15_IAS0 R15_IAS1 R16_IAS0 R16_IAS1 R24_IAS0 R24_IAS1: library part "R 0R0 1% 0603", "Standard Resistor SMD/0603/1%/100mW/TK200", KHK Part Number=K8250041, Manufacturer=several, Supplier Part Number 1=311-0.0HRCT-ND, Tolerance=1%, Manufacturer Part Number=several, Supplier 1=Digi-Key
R2_IAS0 R2_IAS1 R4_IAS0 R4_IAS1 R5_IAS0 R5_IAS1 R6_IAS0 R6_IAS1 R7_IAS0 R7_IAS1 R8_IAS0 R8_IAS1 R10_IAS0 R10_IAS1 R17_IAS0 R17_IAS1 R18_IAS0 R18_IAS1 R72_IAS0 R72_IAS1 R73_IAS0 R73_IAS1 R74_IAS0 R74_IAS1 R75_IAS0 R75_IAS1 R101_IAS0 R101_IAS1: library part "R X 0603", "Standard Resistor SMD/0603/1%/100mW/TK200", Temperature Coefficient=TK100, Tolerance=1%
R11_IAS0 R11_IAS1: library part "R X 0402", "Standard Resistor SMD/0402/1%/63mW/TK200", Temperature Coefficient=TK100, Tolerance=1%
R12_IAS0 R12_IAS1: library part "R 270K 1% 0402", "Standard Resistor SMD/0402/1%/63mW/TK100", KHK Part Number=3875, Manufacturer=several, Supplier Part Number 1=CR0402-FX-2703GLFCT-ND, Temperature Coefficient=TK100, Tolerance=1%, Manufacturer Part Number=several, Supplier 1=Digi-Key
R13_IAS0 R13_IAS1: library part "R 3k3 1% 0402", "Standard Resistor SMD/0402/1%/63mW/TK100", KHK Part Number=K8250347, Manufacturer=several, Supplier Part Number 1=311-3.30KLRCT-ND, Temperature Coefficient=TK100, Tolerance=1%, Manufacturer Part Number=several, Supplier 1=Digi-Key
R14_IAS0 R14_IAS1: library part "R 51K 1% 0402", "Standard Resistor SMD/0402/1%/63mW/TK100", KHK Part Number=K8250273, Manufacturer=several, Supplier Part Number 1=311-51.0KLRCT-ND, Temperature Coefficient=TK100, Tolerance=1%, Manufacturer Part Number=several, Supplier 1=Digi-Key
R19_IAS0 R19_IAS1: library part "R 200K 1% 0402", "Standard Resistor SMD/0402/1%/63mW/TK100", KHK Part Number=K8250280, Manufacturer=several, Supplier Part Number 1=311-200KLRCT-ND, Temperature Coefficient=TK100, Tolerance=1%, Manufacturer Part Number=several, Supplier 1=Digi-Key, Supplier 2=Arrow, Supplier 3=Arrow, Supplier Part Number 2=CRCW0402200KFKED, Supplier Part Number 3=NRC04F2003TRF
R20_IAS0 R20_IAS1 R21_IAS0 R21_IAS1 R22_IAS0 R22_IAS1 R23_IAS0 R23_IAS1: library part "R 2k0 1% 0402", "Standard Resistor SMD/0402/1%/63mW/TK100", KHK Part Number=K8250311, Manufacturer=several, Supplier Part Number 1=311-2KLRCT-ND, Temperature Coefficient=TK100, Tolerance=1%, Manufacturer Part Number=several, Supplier 1=Digi-Key
R27_IAS0 R27_IAS1: library part "R 0R0 1% 0603", "Standard Resistor SMD/0603/1%/100mW/TK100", KHK Part Number=K8250041, Manufacturer=several, Tolerance=1%, Manufacturer Part Number=several
T1: library part "PCB TEXT FIELD TOP", "PCB Textfield TOP"
T2: library part "PCB TEXT FIELD BOT", "PCB Textfield BOT"
TP1_IAS0 TP1_IAS1 TP2_IAS0 TP2_IAS1 TP3_IAS0 TP3_IAS1 TP4_IAS0 TP4_IAS1 TP5_IAS0 TP5_IAS1 TP6_IAS0 TP6_IAS1: library part TP_16_10, "Testpoint: Pad=1,6mm; Hole=1,0mm"
U1_IAS0 U1_IAS1: library part "IC INA260", "IC/PWR/CURR SHUNT MONITOR/2.7-5.5V;4.5mR/TSSOP16/5.0x4.4x1.2mm", KHK Part Number=16206, Manufacturer=TI, Supplier Part Number 1=296-47777-1-ND, Manufacturer Part Number=INA260AIPWR, Supplier 1=Digi-Key
U2_IAS0 U2_IAS1: library part "IC  TPS25200DRVT", "IC/PWR/LOADSW;2V5-6V5;2A5;0R099/6-WDFN/2x2x0.8mm", KHK Part Number=14277, Manufacturer="Texas Instruments", Supplier Part Number 1=296-37760-1-ND, I max=2.5A, Manufacturer Part Number=TPS25200DRVT, Supplier 1=Digi-Key, Vin=2.5V-6.5V
U3_IAS0 U3_IAS1: library part "IC PCA9306DCTR", "IC/LOGIC/LEVELSHIFTER;I2C;AUTO-DIR;1V2-5V/SSOP-8/4.25x3.15x1.3mm", KHK Part Number=9555, Manufacturer=TI, Supplier Part Number 1=296-18509-1-ND, Manufacturer Part Number=PCA9306DCTR, Supplier 1=Digi-Key
U4_IAS0 U4_IAS1: library part "IC NTB0104GU12,115", "IC/LOGIC/Levelshifter;Auto-Dir;Bidirectional;Push-Pull;-40-+125°C/", KHK Part Number=14383, Manufacturer=NXP, Supplier Part Number 1=568-5204-1-ND, Manufacturer Part Number=NTB0104GU12,115, Supplier 1=Digi-Key
U5_IAS0 U5_IAS1: library part "IC NCP114AMX330TCG", "IC/PWR/LDO;1V7-5V5;3V3;0A3/XDFN4/1x1x0.6mm", KHK Part Number=20303, Manufacturer="ON Semi", Iout="Iout : 300mA", Manufacturer Part Number=NCP114AMX330TCG, Vin="Vin : 1.7V-5.5V", Vout=3.3V
X1_IAS0 X1_IAS1: library part "PCB HOLE 3.4-6-DK", "HOLE 3.4-6-M3 Alternative"

## Free pads (board coordinates)
  round 0 hole 0.4 unplated: 2(56.9,9.05) 2(56.9,10.05) 2(56.9,11.05) 2(56.9,12.05)
  round 0 hole 1 unplated paste+0 mask+0: 3(1.4,18.6) 3(8.6,11.4) 3(110.4,11.4) 3(117.6,18.6)

## Via types
v1: diameter 0.5, hole 0.2, Layer1 Top to Layer4 Bottom, 229 vias

## Nets (pads, with @x,y where several pads share a name; then routed paths per layer and width w, separated by ;. In a path a pad name is that pad's centre, name@x,y a point inside that pad or via, vN(x,y) a via of type N, cw(c..) or ccw(c..) an arc to the next point about the centre after c; other vN are vias at no path point)
B7-CSI2-TXC_IAS0_N: J7_IAS0.14 J8_IAS0.8 | length 31.1
  Layer1 Top w0.125: J7_IAS0.14@46.85,17.2 46.876,17.226 46.876,17.576 47.059,17.759 47.4,18.1 47.4,18.29 47.505,18.395 47.505,18.545 47.4,18.65 47.4,18.75 47.4,20.825 47.4,21.706 ccw(c46.788,21.706) 46.788,22.319 46.742,22.319 cw(c46.742,22.681) 46.742,23.044 47.343,23.044 ccw(c47.343,23.656) 47.343,24.269 46.652,24.269 cw(c46.652,24.631) 46.652,24.994 47.343,24.994 ccw(c47.343,25.606) 47.343,26.219 46.652,26.219 cw(c46.652,26.581) 46.652,26.944 46.788,26.944 ccw(c46.788,27.556) 47.4,27.556 47.4,30.669 47.4,32.246 48.05,32.896 v1(48.05,34.15)
  Layer4 Bottom w0.125: J8_IAS0.8@47.38,40.9 47.432,40.848 47.432,40.612 47.455,40.589 47.455,39.559 47.25,39.354 47.25,37.396 47.473,37.173 47.8,36.846 47.8,35.311 47.8,35.175 47.612,34.987 47.612,34.588 v1(48.05,34.15)
B7-CSI2-TXC_IAS0_P: J7_IAS0.15 J8_IAS0.7 | length 31.1
  Layer1 Top w0.125: J7_IAS0.15@46.35,17.2 46.35,17.411 47.15,18.211 47.15,20.825 47.15,21.706 ccw(c46.788,21.706) 46.788,22.069 46.742,22.069 cw(c46.742,22.681) 46.742,23.294 47.343,23.294 ccw(c47.343,23.656) 47.343,24.019 46.652,24.019 cw(c46.652,24.631) 46.652,25.244 47.343,25.244 ccw(c47.343,25.606) 47.343,25.969 46.652,25.969 cw(c46.652,26.581) 46.652,27.194 46.788,27.194 ccw(c46.788,27.556) 47.15,27.556 47.15,30.669 47.15,32.35 47.8,33 47.8,33.775 47.612,33.963 47.612,34.362 v1(48.05,34.8)
  Layer4 Bottom w0.125: J8_IAS0.7@47.78,40.9 47.727,40.848 47.727,40.612 47.705,40.589 47.705,39.455 47.5,39.25 47.5,37.5 48.05,36.95 v1(48.05,34.8)
B7-CSI2-TXC_IAS1_N: J7_IAS1.14 J8_IAS1.8 | length 31.1
  Layer1 Top w0.125: J7_IAS1.14@96.89,17.2 96.916,17.226 96.916,17.576 97.099,17.759 97.44,18.1 97.44,18.29 97.545,18.395 97.545,18.545 97.44,18.65 97.44,18.75 97.44,20.825 97.44,21.706 ccw(c96.827,21.706) 96.827,22.319 96.782,22.319 cw(c96.782,22.681) 96.782,23.044 97.383,23.044 ccw(c97.383,23.656) 97.383,24.269 96.692,24.269 cw(c96.692,24.631) 96.692,24.994 97.383,24.994 ccw(c97.383,25.606) 97.383,26.219 96.692,26.219 cw(c96.692,26.581) 96.692,26.944 96.827,26.944 ccw(c96.827,27.556) 97.44,27.556 97.44,30.669 97.44,32.246 98.09,32.896 v1(98.09,34.15)
  Layer4 Bottom w0.125: J8_IAS1.8@97.42,40.9 97.472,40.847 97.472,40.612 97.495,40.589 97.495,39.559 97.29,39.354 97.29,37.396 97.513,37.173 97.84,36.846 97.84,35.311 97.84,35.175 97.652,34.987 97.652,34.588 v1(98.09,34.15)